# Altium PCB LAB7.PcbDoc
Units mil, origin at the board's own origin, x right, y up, seen from the top; angles counter-clockwise.
Board outline 11460.51 x 8892.52 mil, 2 copper layers (Top Layer, Top, Bottom Layer, Bottom); 19 components, 15 nets, 272 pads, 3 vias.
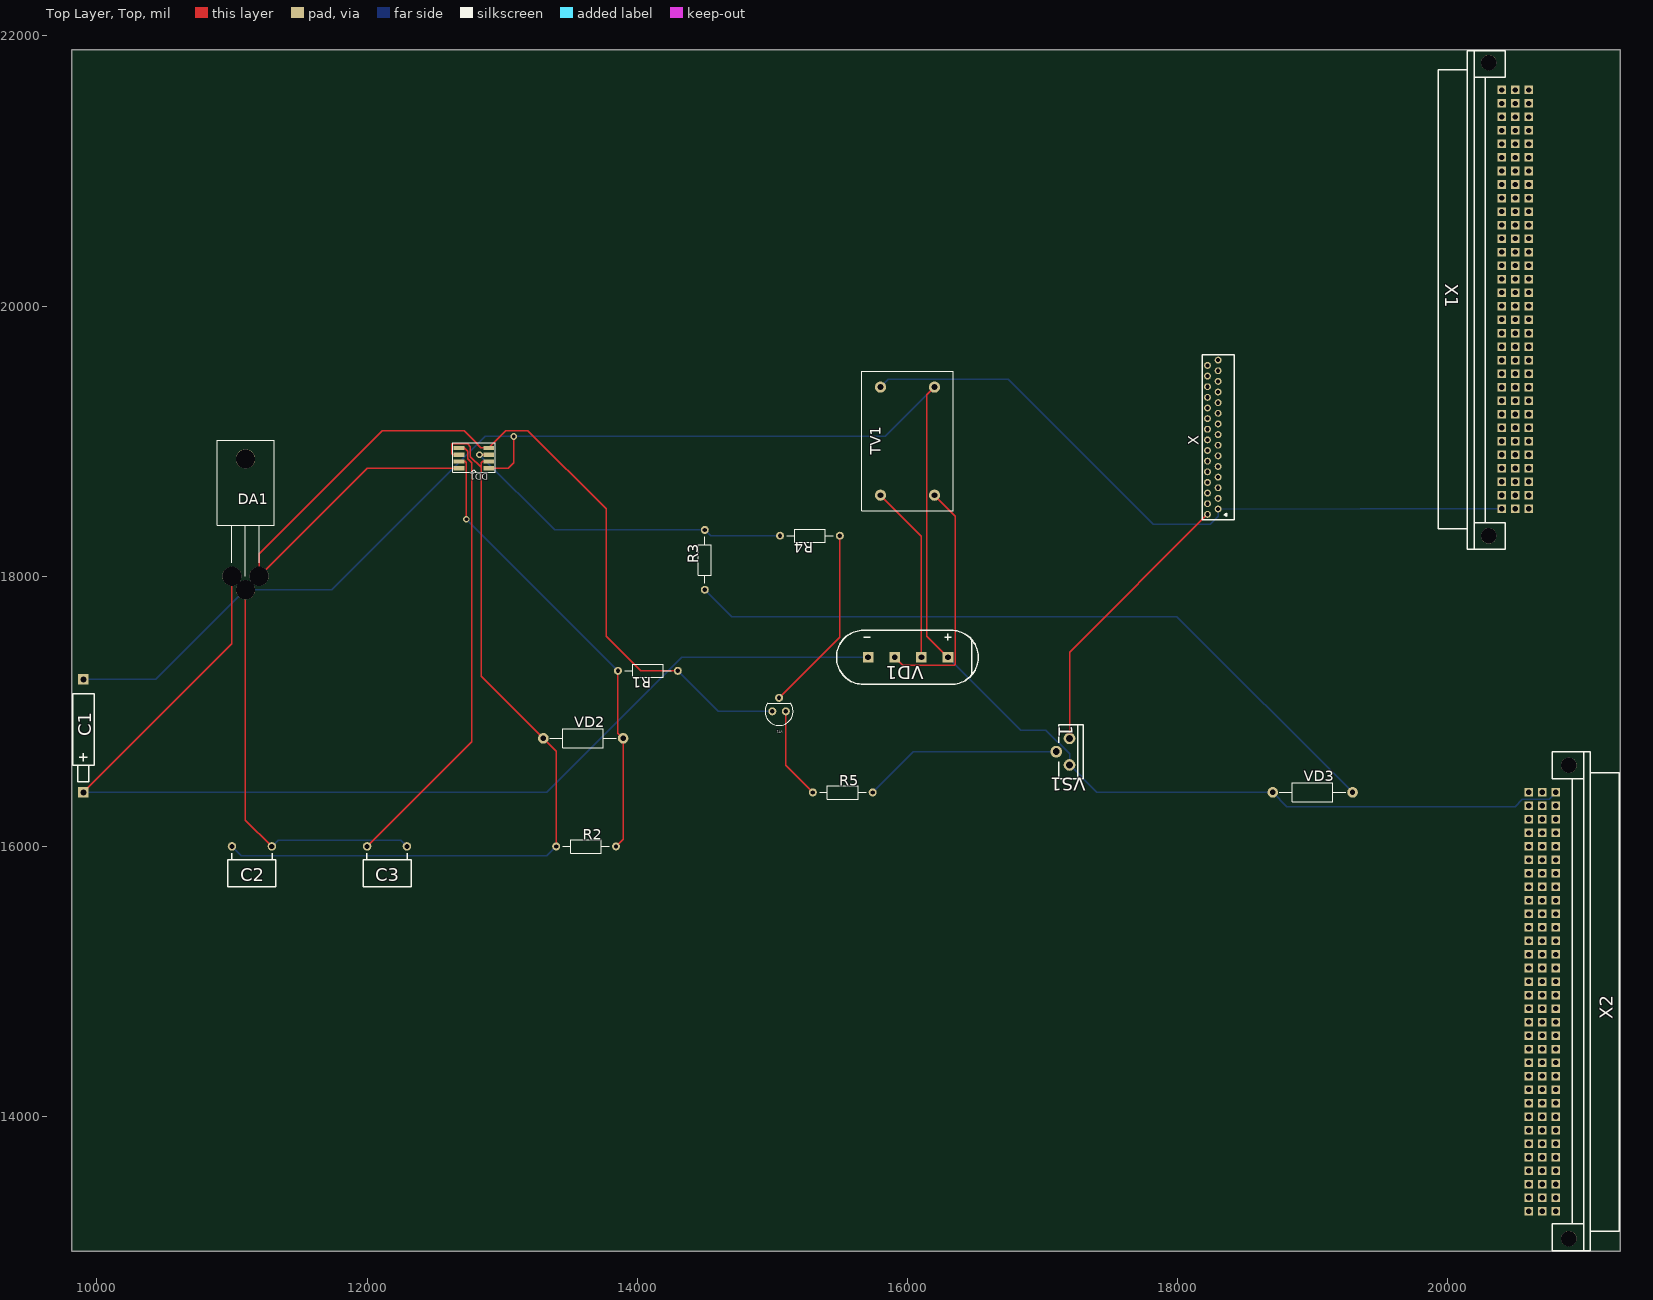
[diagram p0: Top Layer, Top view]
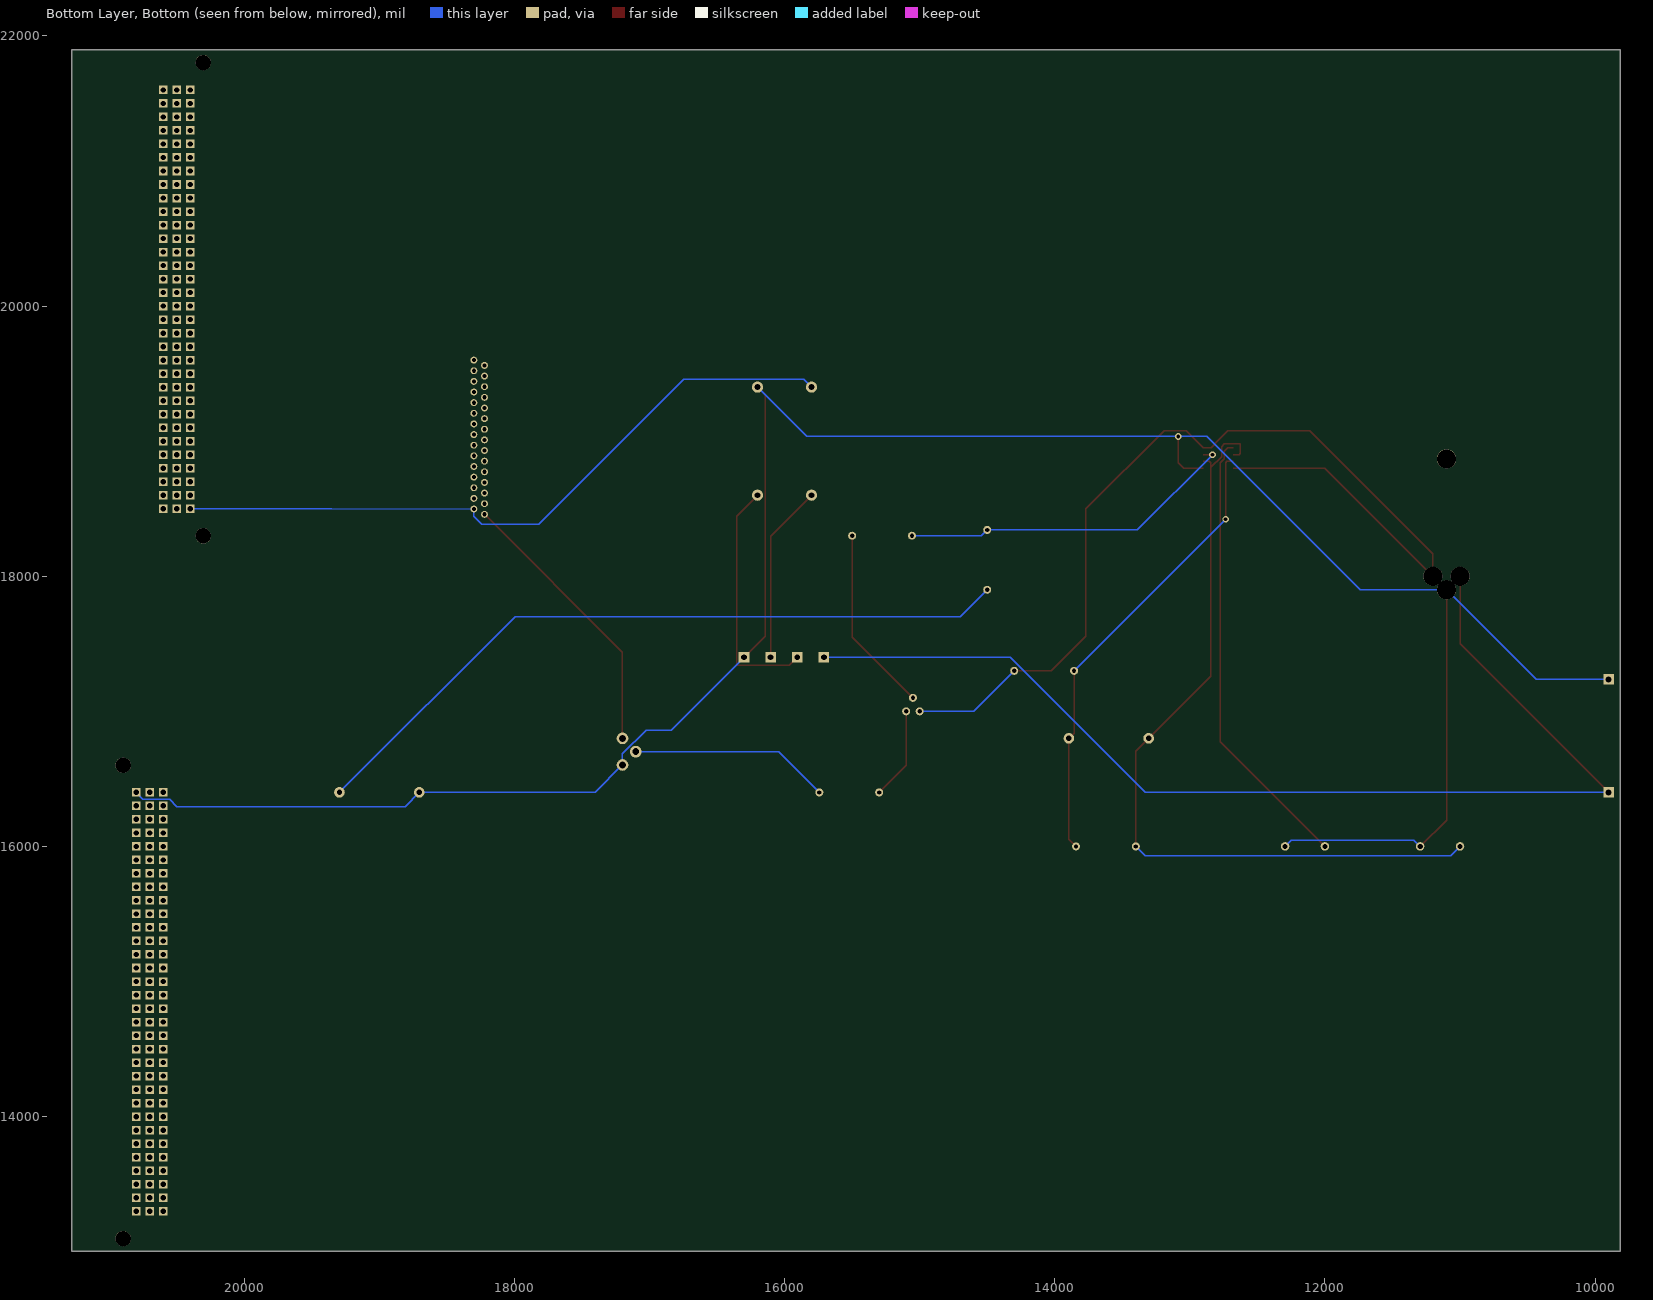
[diagram p1: Bottom Layer, Bottom view, seen from below]

## Layer stack, top to bottom
Top Solder, Top Mask: solder mask 0.4, Solder Resist, Dk 3.5
Top Layer, Top: signal copper 1.4
Dielectric 1: dielectric 12.6, FR-4, Dk 4.8
Bottom Layer, Bottom: signal copper 1.4
Bottom Solder, Bot Mask: solder mask 0.4, Solder Resist, Dk 3.5

## Board outline
9815.08,13003.74 21275.59,13003.74 21275.59,21896.26 9815.08,21896.26

## Design rules (kind name [scope] priority, off if disabled: settings)
Clearance [All] p1: gap=10 ignorepadtopadclearanceinfootprint=FALSE
PlaneClearance [All] p1: clearance=10
PolygonConnect [All] p1: connectstyle=Relief reliefconductorwidth=10 reliefentries=4 polygonreliefangle="90 Angle" airgapwidth=10
RoutingVias [All] p1: holewidth=28 width=50 viastyle="Through Hole" minholewidth=28 minwidth=50 maxholewidth=28 maxwidth=50
SolderMaskExpansion [All] p1: expansion=0 istentingtop=FALSE
Width [All] p1: maxlimit=10 minlimit=10 preferedwidth=10
29 further rules are at their usual default settings.

## Components (designator, comment, footprint, x,y, rotation, side; value= is the part's Value field where it differs from the comment)
C1 "" K534A-3 9900,16400 r90 top
C2 "" 1017-B3R 11000,16000 r0 top
C3 "" 1017-B3R 12000,16000 r0 top
DA1 "" TO-220-KT-28-2_КР142ЕН5А(PriBF_TO-220-KT-28-2_КР142ЕН5А(PriBF(Primary) 11000,18000 r0 top
DD1 "" SO-8 12900,18800 r180 top
R1 "" C2-33H-0.125W 14300,17300 r180 top
R2 "" C2-33H-0.125W 13400,16000 r0 top
R3 "" C2-33H-0.125W 14500,17900 r90 top
R4 "" C2-33H-0.125W 15500,18300 r180 top
R5 "" C2-33H-0.125W 15300,16400 r0 top
TV1 "" 5200_MURATA 16000.24,19000.07 r90 top
VD1 "" KC412 16300,17400 r180 top
VD2 "" DO-7_1N34(Primary)_DO-7_1N34(Primary)(Primary) 13600,16800 r0 top
VD3 "" DO-7_1N34(Primary)_DO-7_1N34(Primary)(Primary) 19000,16400 r0 top
VS1 "" KT28-1_Primary 17200,16800 r180 top
VT1 "" TO-92-1 15100,17000 r180 top
X "" 30FMN 18300,19600 r90 top
X1 "" XX96 20400,18500 r90 top
X2 "" XX96 20800,16400 r270 top

## Footprints (in the part's own frame and the unit in brackets; to place one, negate y for a bottom-side part, rotate by r counter-clockwise, add the part's x,y. Pads: shape width x height; smd on the part's side, far side on the other; paste and mask are expansions set on the pad)
30FMN [mm]
  round 1.3 hole 0.8: 1(-29,2) 2(-28,0) 3(-27,2) 4(-26,0) 5(-25,2) 6(-24,0) 7(-23,2) 8(-22,0) 9(-21,2) 10(-20,0) 11(-19,2) 12(-18,0) 13(-17,2) 14(-16,0) 15(-15,2) 16(-14,0) 17(-13,2) 18(-12,0) 19(-11,2) 20(-10,0) 21(-9,2) 22(-8,0) 23(-7,2) 24(-6,0) 25(-5,2) 26(-4,0) 27(-3,2) 28(-2,0) 29(-1,2) 30(0,0)
  silkscreen extent -30,-3 1,3
1017-B3R [mm]
  round 1.6 hole 1: 1(0,0) 2(7.5,0)
  silkscreen extent -0.76,-7.62 8.27,-1.26
5200_MURATA [mm]
  round 2.1 hole 1.1: 1(-10.16,-5.08) 2(10.16,-5.08) 3(10.16,5.08) 4(-10.16,5.08)
  silkscreen extent -13.13,-8.63 13.13,8.63
C2-33H-0.125W [mm]
  round 1.5 hole 0.8: 1(0,0) 2(11.25,0)
  silkscreen extent 1.25,-1.25 10,1.25
DO-7_1N34(Primary)_DO-7_1N34(Primary)(Primary) [mm]
  round 2 hole 1: A(7.5,0) K(-7.5,0)
  silkscreen extent -6.25,-1.8 6.25,1.8
K534A-3 [mm]
  rect 2x2 hole 1.1: 1(0,0) 2(21.25,0)
  silkscreen extent 2.03,-2.03 18.54,2.03
KC412 [mm]
  rect 2x2 hole 1.1: 1(0,0) 2(5,0) 3(15,0) 4(10,0)
  silkscreen extent -5.71,-5.08 20.95,5.08
KT28-1_Primary [mm]
  round 2.2 hole 1.3: 1(0,0) 2(2.5,2.5) 3(0,5)
  silkscreen extent -2.54,-2.54 2.06,7.62
SO-8 [mm]
  rect 2x0.8 smd: 1(0,0) 2(0,-1.27) 3(0,-2.54) 4(0,-3.81) 5(5.588,-3.81) 6(5.588,-2.54) 7(5.588,-1.27) 8(5.588,0)
  silkscreen extent -1.21,-4.75 6.79,0.75
TO-92-1 [mm]
  round 1.5 hole 0.8: 1(0,0) 2(1.27,-2.54) 3(2.54,0)
  silkscreen extent -1.35,-1.5 3.92,2.65
TO-220-KT-28-2_КР142ЕН5А(PriBF_TO-220-KT-28-2_КР142ЕН5А(PriBF(Primary) [mm]
  round 3.6 hole 3.6: 2(5.08,0) 4(2.55,22.07) 8(2.54,-2.54) 17(0,0)
  silkscreen extent -2.8,0 7.95,25.57
XX96 [mm]
  rect 1.6x1.6 hole 1: 1(0,0) 2(2.54,0) 3(5.08,0) 4(7.62,0) 5(10.16,0) 6(12.7,0) 7(15.24,0) 8(17.78,0) 9(20.32,0) 10(22.86,0) 11(25.4,0) 12(27.94,0) 13(30.48,0) 14(33.02,0) 15(35.56,0) 16(38.1,0) 17(40.64,0) 18(43.18,0) 19(45.72,0) 20(48.26,0) 21(50.8,0) 22(53.34,0) 23(55.88,0) 24(58.42,0) 25(60.96,0) 26(63.5,0) 27(66.04,0) 28(68.58,0) 29(71.12,0) 30(73.66,0) 31(76.2,0) 32(78.74,0) 33(0,-2.54) 34(2.54,-2.54) 35(5.08,-2.54) 36(7.62,-2.54) 37(10.16,-2.54) 38(12.7,-2.54) 39(15.24,-2.54) 40(17.78,-2.54) 41(20.32,-2.54) 42(22.86,-2.54) 43(25.4,-2.54) 44(27.94,-2.54) 45(30.48,-2.54) 46(33.02,-2.54) 47(35.56,-2.54) 48(38.1,-2.54) 49(40.64,-2.54) 50(43.18,-2.54) 51(45.72,-2.54) 52(48.26,-2.54) 53(50.8,-2.54) 54(53.34,-2.54) 55(55.88,-2.54) 56(58.42,-2.54) 57(60.96,-2.54) 58(63.5,-2.54) 59(66.04,-2.54) 60(68.58,-2.54) 61(71.12,-2.54) 62(73.66,-2.54) 63(76.2,-2.54) 64(78.74,-2.54) 65(0,-5.08) 66(2.54,-5.08) 67(5.08,-5.08) 68(7.62,-5.08) 69(10.16,-5.08) 70(12.7,-5.08) 71(15.24,-5.08) 72(17.78,-5.08) 73(20.32,-5.08) 74(22.86,-5.08) 75(25.4,-5.08) 76(27.94,-5.08) 77(30.48,-5.08) 78(33.02,-5.08) 79(35.56,-5.08) 80(38.1,-5.08) 81(40.64,-5.08) 82(43.18,-5.08) 83(45.72,-5.08) 84(48.26,-5.08) 85(50.8,-5.08) 86(53.34,-5.08) 87(55.88,-5.08) 88(58.42,-5.08) 89(60.96,-5.08) 90(63.5,-5.08) 91(66.04,-5.08) 92(68.58,-5.08) 93(71.12,-5.08) 94(73.66,-5.08) 95(76.2,-5.08) 96(78.74,-5.08)
  round 2.9 hole 2.9: 97(-5.11,2.455) 98(83.89,2.455)
  silkscreen extent -7.61,-0.67 86.14,11.96

## Via types
v1: diameter 50, hole 28, Top Layer, Top to Bottom Layer, Bottom, 3 vias

## Nets (pads, with @x,y where several pads share a name; then routed paths per layer and width w, separated by ;. In a path a pad name is that pad's centre, name@x,y a point inside that pad or via, vN(x,y) a via of type N, cw(c..) or ccw(c..) an arc to the next point about the centre after c; other vN are vias at no path point)
NET00000: R3.1 VD3.A | length 5416.6
  Bottom Layer, Bottom w10: R3.1 14700,17700 17995.28,17700 VD3.A
NET00001: TV1.4 VD1.2 | length 1325.5
  Top Layer, Top w10: TV1.4 16103.15,18297.16 VD1.2
NET00002: C1.1 DA1.17 VD1.3 | length 8279.3
  Top Layer, Top w10: C1.1 11000,17500 DA1.17
  Bottom Layer, Bottom w10: C1.1 13330,16400 14330,17400 VD1.3
NET00003: TV1.1 VD1.4 | length 1791.9
  Top Layer, Top w10: VD1.4 15966.3,17340 16345,17340 16355,17350 16355,18445.31 TV1.1
NET00004: DA1.2 DD1.4 DD1.8 R1.1 VT1.3 | length 7676.9
  Top Layer, Top w10: DD1.8 12000,18800 DA1.2 11200,18165 12113,19078 12720,19078 12790,19008 12840,18950 DD1.4 13028,19078 13191,19078 13770,18499 13770,17555 14025,17300 R1.1
  Bottom Layer, Bottom w10: R1.1 14600,17000 VT1.3
NET00005: VS1.1 X.1 | length 2081.3
  Top Layer, Top w10: VS1.1 17200,17437.01 X.1
NET00006: DD1.7 R1.2 R2.2 VD2.A | length 3401.4
  Top Layer, Top w10: DD1.7 12725,18850 12735,18840 v1(12735,18422.09) ; R2.2 13895.28,16052.36 VD2.A 13857.09,16838.19 R1.2
  Bottom Layer, Bottom w10: v1(12735,18422.09) R1.2
NET00008: C2.1 DD1.2 DD1.6 R2.1 VD2.K | length 6053
  Top Layer, Top w10: DD1.6 12635,18900 12625,18910 12625,18981 12744,18981 12765,18960 12765,18886 12845,18806 ; DD1.2 12855,18850 12845,18840 12845,18806 ; R2.1 13400,16704.72 VD2.K 12845,17259.72 12845,18806
  Bottom Layer, Bottom w10: C2.1 11070,15930 13330,15930 R2.1
NET00009: C3.1 DD1.5 | length 3333.8
  Top Layer, Top w10: C3.1 12775,16775 12775,18839 12745,18869 12745,18925 12720,18950 DD1.5
NET00010: DD1.3 R3.2 R4.2 | length 2541.6
  Top Layer, Top w10: v1(12832,18899) 12833,18900 DD1.3
  Bottom Layer, Bottom w10: v1(12832,18899) 13388.09,18342.91 R3.2 14542.91,18300 R4.2
NET00012: R4.1 VT1.2 | length 1386.4
  Top Layer, Top w10: VT1.2 15500,17550 R4.1
NET00013: R5.1 VT1.1 | length 682.8
  Top Layer, Top w10: VT1.1 15100,16600 R5.1
NET00014: R5.2 VS1.2 | length 1483.6
  Bottom Layer, Bottom w10: R5.2 16044.49,16701.57 VS1.2
NET00015: TV1.3 X1.1 X.2 | length 5144.9
  Bottom Layer, Bottom w10: TV1.3 15857.18,19457 16748,19457 17820,18385 18240,18385 18300,18445 X.2 19352.36,18500 X1.1
NET00016: C1.2 C2.2 C3.2 DA1.8 DD1.1 TV1.2 VD1.1 VD3.K VS1.3 X2.1 | length 17752.1
  Top Layer, Top w10: DA1.8 11100,16195.28 C2.2 ; DD1.1 13046,18800 13086,18840 v1(13086,19035) ; TV1.2 16143,19342.82 16143,17557 VD1.1
  Bottom Layer, Bottom w10: C1.2 10436.61,17236.61 DA1.8 11739,17900 12874,19035 v1(13086,19035) 15835.18,19035 TV1.2 ; C2.2 11342.28,16047 12248.28,16047 C3.2 ; VD1.1 16839,16861 17024.61,16861 17200,16685.61 VS1.3 17403.15,16400 VD3.K 18809.72,16295 20498,16295 20553,16350 20750,16350 X2.1
pads on no net: DA1.4 X1.2 X1.3 X1.4 X1.5 X1.6 X1.7 X1.8 X1.9 X1.10 X1.11 X1.12 X1.13 X1.14 X1.15 X1.16 X1.17 X1.18 X1.19 X1.20 X1.21 X1.22 X1.23 X1.24 X1.25 X1.26 X1.27 X1.28 X1.29 X1.30 X1.31 X1.32 X1.33 X1.34 X1.35 X1.36 X1.37 X1.38 X1.39 X1.40 X1.41 X1.42 X1.43 X1.44 X1.45 X1.46 X1.47 X1.48 X1.49 X1.50 X1.51 X1.52 X1.53 X1.54 X1.55 X1.56 X1.57 X1.58 X1.59 X1.60 X1.61 X1.62 X1.63 X1.64 X1.65 X1.66 X1.67 X1.68 X1.69 X1.70 X1.71 X1.72 X1.73 X1.74 X1.75 X1.76 X1.77 X1.78 X1.79 X1.80 X1.81 X1.82 X1.83 X1.84 X1.85 X1.86 X1.87 X1.88 X1.89 X1.90 X1.91 X1.92 X1.93 X1.94 X1.95 X1.96 X1.97 X1.98 X2.2 X2.3 X2.4 X2.5 X2.6 X2.7 X2.8 X2.9 X2.10 X2.11 X2.12 X2.13 X2.14 X2.15 X2.16 X2.17 X2.18 X2.19 X2.20 X2.21 X2.22 X2.23 X2.24 X2.25 X2.26 X2.27 X2.28 X2.29 X2.30 X2.31 X2.32 X2.33 X2.34 X2.35 X2.36 X2.37 X2.38 X2.39 X2.40 X2.41 X2.42 X2.43 X2.44 X2.45 X2.46 X2.47 X2.48 X2.49 X2.50 X2.51 X2.52 X2.53 X2.54 X2.55 X2.56 X2.57 X2.58 X2.59 X2.60 X2.61 X2.62 X2.63 X2.64 X2.65 X2.66 X2.67 X2.68 X2.69 X2.70 X2.71 X2.72 X2.73 X2.74 X2.75 X2.76 X2.77 X2.78 X2.79 X2.80 X2.81 X2.82 X2.83 X2.84 X2.85 X2.86 X2.87 X2.88 X2.89 X2.90 X2.91 X2.92 X2.93 X2.94 X2.95 X2.96 X2.97 X2.98 X.3 X.4 X.5 X.6 X.7 X.8 X.9 X.10 X.11 X.12 X.13 X.14 X.15 X.16 X.17 X.18 X.19 X.20 X.21 X.22 X.23 X.24 X.25 X.26 X.27 X.28 X.29 X.30

## Text inside footprints (layer, text, board x,y; h text height)
VS1: Top Overlay, Top Silk "1" at 17118.78,16895.98 h104.17 r270
VT1: Mechanical 1, Top Assy "C" at 15009.84,16968.9 h10.25 r180; Mechanical 1, Top Assy "E" at 15127.95,16968.9 h10.25 r180; Mechanical 1, Top Assy "BASE" at 15070.47,17049.21 h10.25 r180